# Altium PCB STM32H743I-EVAL2PCBDESIGN.PcbDoc (part 11 of 23)
Units mil, origin at the board's own origin, x right, y up, seen from the top; angles counter-clockwise.
Board outline 6558 x 5417 mil, 8 copper layers (L1_TOP, L2_GND, L3_HS1, L4_POWER, L5_SIG, L6_HS2, L7_GND, L8_BOTTOM), stack 61.368 mil thick; 620 components, 588 nets, 2945 pads, 1724 vias.
Unrouted connection lines stored in the file: 1.
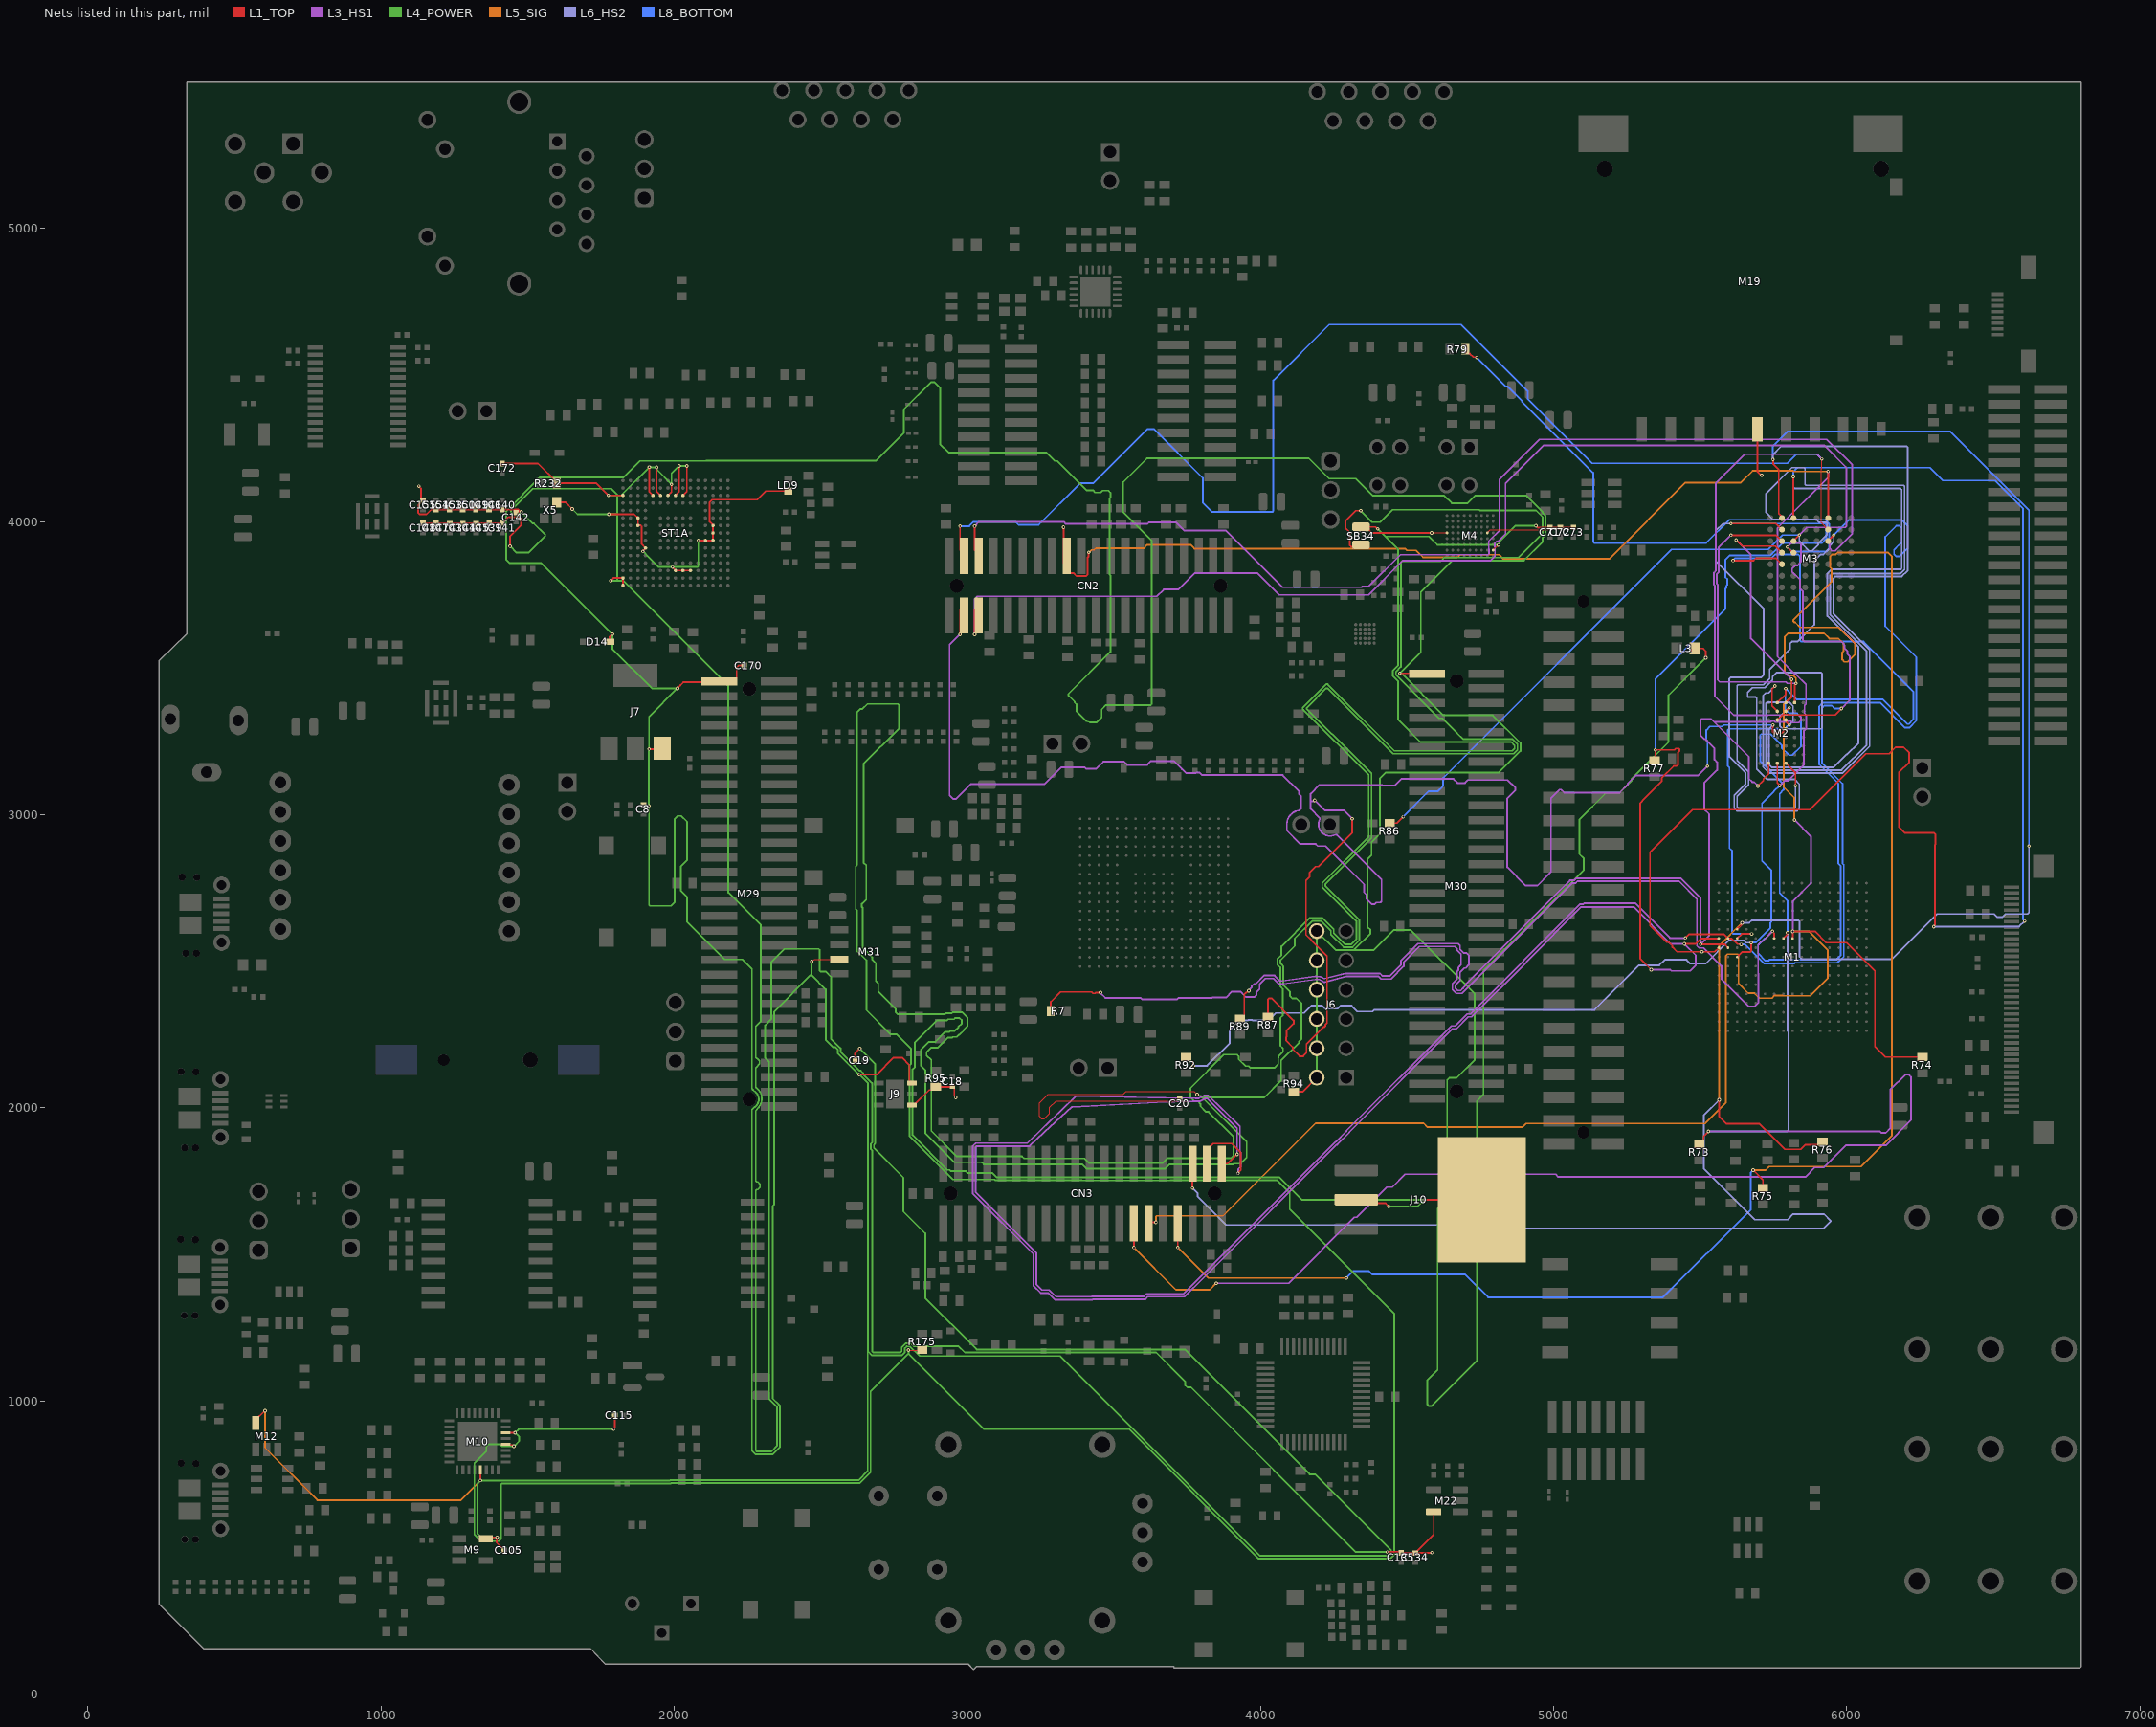
[diagram p9: the nets of this part, all layers, seen from the top]

## Part data (continued)
R208 R210 R224 R257 R267: library part RC0402FR-07100RL, "Res Thick Film 0402 100 Ohm 1% 0.063W(1/16W) ±100ppm/C Pad SMD T/R", Case Code (Imperial)=0402, Manufacturer="Yageo Group", Max Operating Temperature=155°C, Min Operating Temperature=-55°C, Power Rating=62.5mW, Supplier Part Number=311-100LRDKR-ND, Temperature Coefficient=100ppm/°C, Tolerance=1%, Voltage Rating=50V, Case/Package=0402, Category="Chip SMD Resistors", China RoHS=Non-Compliant, ComponentLink1Description=https://datasheet.octopart.com:443/RC0402FR-07100RL-Yageo-datasheet-175887523.pdf?src-supplier=Newark, ComponentLink1URL=https://datasheet.octopart.com:443/RC0402FR-07100RL-Yageo-datasheet-175887523.pdf?src-supplier=Newark, ComponentLink2Description=https://datasheet.octopart.com:443/RC0402FR-07100RL-Yageo-datasheet-8324527.pdf?src-supplier=Newark, ComponentLink2URL=https://datasheet.octopart.com:443/RC0402FR-07100RL-Yageo-datasheet-8324527.pdf?src-supplier=Newark, ComponentLink3Description=https://datasheet.octopart.com:443/RC0402FR-07100RL-Yageo-datasheet-12531192.pdf?src-supplier=Newark, ComponentLink3URL=https://datasheet.octopart.com:443/RC0402FR-07100RL-Yageo-datasheet-12531192.pdf?src-supplier=Newark, ComponentLink4Description=https://datasheet.octopart.com:443/RC0402FR-07100RL-Yageo-datasheet-103092701.pdf?src-supplier=Upverter, ComponentLink4URL=https://datasheet.octopart.com:443/RC0402FR-07100RL-Yageo-datasheet-103092701.pdf?src-supplier=Upverter, ComponentLink5Description=https://datasheet.octopart.com:443/RC0402FR-07100RL-Yageo-Group-datasheet-190305687.pdf?src-supplier=Future+Electronics, ComponentLink5URL=https://datasheet.octopart.com:443/RC0402FR-07100RL-Yageo-Group-datasheet-190305687.pdf?src-supplier=Future+Electronics, ComponentLink6Description=https://datasheet.octopart.com:443/RC0402FR-07100RL-Yageo-datasheet-164759695.pdf?src-supplier=Future+Electronics, ComponentLink6URL=https://datasheet.octopart.com:443/RC0402FR-07100RL-Yageo-datasheet-164759695.pdf?src-supplier=Future+Electronics, ComponentLink7Description=https://datasheet.octopart.com:443/RC0402FR-07100RL-Yageo-datasheet-137700087.pdf?src-supplier=Future+Electronics, ComponentLink7URL=https://datasheet.octopart.com:443/RC0402FR-07100RL-Yageo-datasheet-137700087.pdf?src-supplier=Future+Electronics, ComponentLink8Description=https://datasheet.octopart.com:443/RC0402FR-07100RL-Yageo-datasheet-8324255.pdf?src-supplier=Future+Electronics, ComponentLink8URL=https://datasheet.octopart.com:443/RC0402FR-07100RL-Yageo-datasheet-8324255.pdf?src-supplier=Future+Electronics, ComponentLink9Description=https://datasheet.octopart.com:443/RC0402FR-07100RL-Yageo-datasheet-10408619.pdf?src-supplier=element14+APAC, ComponentLink9URL=https://datasheet.octopart.com:443/RC0402FR-07100RL-Yageo-datasheet-10408619.pdf?src-supplier=element14+APAC, ComponentLink10Description=https://datasheet.octopart.com:443/RC0402FR-07100RL-Yageo-datasheet-21426659.pdf?src-supplier=element14+APAC, ComponentLink10URL=https://datasheet.octopart.com:443/RC0402FR-07100RL-Yageo-datasheet-21426659.pdf?src-supplier=element14+APAC, ComponentLink11Description=https://datasheet.octopart.com:443/RC0402FR-07100RL-Yageo-datasheet-62067350.pdf?src-supplier=Farnell, ComponentLink11URL=https://datasheet.octopart.com:443/RC0402FR-07100RL-Yageo-datasheet-62067350.pdf?src-supplier=Farnell, ComponentLink12Description=https://datasheet.octopart.com:443/RC0402FR-07100RL-Yageo-datasheet-8329306.pdf?src-supplier=element14, ComponentLink12URL=https://datasheet.octopart.com:443/RC0402FR-07100RL-Yageo-datasheet-8329306.pdf?src-supplier=element14, ComponentLink13Description=https://datasheet.octopart.com:443/RC0402FR-07100RL-Yageo-datasheet-505231.pdf?src-supplier=element14, ComponentLink13URL=https://datasheet.octopart.com:443/RC0402FR-07100RL-Yageo-datasheet-505231.pdf?src-supplier=element14, ComponentLink14Description=https://datasheet.octopart.com:443/RC0402FR-07100RL-Yageo-Group-datasheet-189192902.pdf?src-supplier=LCSC, ComponentLink14URL=https://datasheet.octopart.com:443/RC0402FR-07100RL-Yageo-Group-datasheet-189192902.pdf?src-supplier=LCSC, ComponentLink15Description=https://datasheet.octopart.com:443/RC0402FR-07100RL-Yageo-datasheet-175423674.pdf?src-supplier=SOS+electronic, ComponentLink15URL=https://datasheet.octopart.com:443/RC0402FR-07100RL-Yageo-datasheet-175423674.pdf?src-supplier=SOS+electronic, ComponentLink16Description=https://datasheet.octopart.com:443/RC0402FR-07100RL-Yageo-datasheet-79472498.pdf?src-supplier=Megastar, ComponentLink16URL=https://datasheet.octopart.com:443/RC0402FR-07100RL-Yageo-datasheet-79472498.pdf?src-supplier=Megastar, ComponentLink17Description=https://datasheet.octopart.com/RC0402FR-07100RL-Yageo-datasheet-73766026.pdf, ComponentLink17URL=https://datasheet.octopart.com/RC0402FR-07100RL-Yageo-datasheet-73766026.pdf, ComponentLink18Description=http://sigma.octopart.com:80/conflict_mineral_statement/Yageo-company-3.pdf?src-supplier=Compliance+Statements, ComponentLink18URL=http://sigma.octopart.com:80/conflict_mineral_statement/Yageo-company-3.pdf?src-supplier=Compliance+Statements, ComponentLink19Description=http://sigma.octopart.com:80/rohs_statement/Yageo-company-2.pdf?src-supplier=Compliance+Statements, ComponentLink19URL=http://sigma.octopart.com:80/rohs_statement/Yageo-company-2.pdf?src-supplier=Compliance+Statements, Composition="Thick Film", Country of Origin="Mainland China, Taiwan", Depth=500µm, Export Control Classification Number (ECCN) Code=EAR99, Harmonized Tariff Schedule (HTS) Code=8533.21.00.30, Height=350µm, Introduction Date=2004-10-04, Lead Free="Lead Free", Length=1mm, Lifecycle Status=Production, Manufacturer Part Number=RC0402FR-07100RL, Military Standard=Not, Mounting Technology="Surface Mount", Number of Terminals=2, Packaging="Tape & Reel", Pins=2, Pricing="1=0.1, 10=0.021, 25=0.0152, 50=0.012, 100=0.0097, 250=0.0074, 500=0.00612, 1000=0.00512, 5000=0.00355 (USD)", REACH SVHC=Yes, RoHS=Compliant, Schedule B="8533210045, 8533210045|8533210045|8533210045|8533210045|8533210045|8533210045|8533210045|8533210045|8533210045|8533210045|8533210045|8533210045|8533210045|8533210045|8533210045|8533210045, 8533210045|8533210045|8533210045|8533210045|8533210045|8533210045|8533210045|8533210045|8533210045|8533210045|8533210045|8533210045|8533210045|8533210045|8533210045|8533210045|8533210045, 8533210045|8533210045|8533210045|8533210045|8533210045|8533210045|8533210045|8533210045|8533210045|8533210045|8533210045|8533210045|8533210045|8533210045|8533210045|8533210045|8533210045|8533210045", Stock=2317990, Supplier=DigiKey, Termination=SMD/SMT, Voltage Rating (DC)=50V, Width=500µm, Working Voltage=50V
R223: library part CRGCQ0402F2K7, "63mW Thick Film Resistors 50V ±100ppm/℃ ±1% 2.7kΩ 0402 Chip Resistor - Surface Mount ROHS", Ambient Temperature Range High=70°C, Case/Package=0402, Manufacturer="TE Connectivity", Manufacturer Lifecycle Status=ACTIVE, Max Operating Temperature=155°C, Min Operating Temperature=-55°C, Operating Supply Voltage=50V, Power Rating=62.5mW, Ratings=AEC-Q200, Supplier Part Number=A129632DKR-ND, Temperature Coefficient=100ppm/°C, Tolerance=1%, Category="Chip SMD Resistors", China RoHS=Non-Compliant, ComponentLink1Description=https://datasheet.octopart.com:443/CRGCQ0402F2K7-TE-Connectivity-datasheet-114679081.pdf?src-supplier=Master+Electronics, ComponentLink1URL=https://datasheet.octopart.com:443/CRGCQ0402F2K7-TE-Connectivity-datasheet-114679081.pdf?src-supplier=Master+Electronics, ComponentLink2Description=https://datasheet.octopart.com:443/3-2176337-0-TE-Connectivity---AMP-datasheet-189108688.pdf?src-supplier=Master+Electronics, ComponentLink2URL=https://datasheet.octopart.com:443/3-2176337-0-TE-Connectivity---AMP-datasheet-189108688.pdf?src-supplier=Master+Electronics, ComponentLink3Description=https://datasheet.octopart.com:443/CRGCQ0402F2K7-TE-Connectivity-datasheet-179161773.pdf?src-supplier=IHS, ComponentLink3URL=https://datasheet.octopart.com:443/CRGCQ0402F2K7-TE-Connectivity-datasheet-179161773.pdf?src-supplier=IHS, ComponentLink4Description=https://sigma.octopart.com:443/114679084/technical_drawing/TE-Connectivity-CRGCQ0402F2K7.pdf?src-supplier=Sager+Electronics, ComponentLink4URL=https://sigma.octopart.com:443/114679084/technical_drawing/TE-Connectivity-CRGCQ0402F2K7.pdf?src-supplier=Sager+Electronics, Composition="Thick Film", Export Control Classification Number (ECCN) Code=EAR99, Harmonized Tariff Schedule (HTS) Code=8533.21.00.30, Height=350µm, Introduction Date=2018-03-13, Length=1mm, Lifecycle Status=Production, Manufacturer Part Number=CRGCQ0402F2K7, Mounting Technology="Surface Mount", Number of Terminals=2, Packaging="Cut Tape", Pricing="1=0.1, 10=0.03, 25=0.0224, 50=0.0182, 100=0.0149, 250=0.01164, 500=0.00978, 1000=0.00832, 5000=0.00603 (USD)", REACH SVHC=Yes, RoHS=Compliant, Schedule B="8533210025, 8533210025|8533210025|8533210025|8533210025|8533210025, 8533210045", Stock=561623, Supplier=DigiKey, Voltage Rating=50V, Voltage Rating (DC)=50V, Width=500µm, Working Voltage=50V
R231: library part AC0402FR-073KL, "Res Thick Film 0402 3K Ohm 1% 0.063W(1/16W) ±100ppm/C Pad SMD Automotive T/R", Case Code (Imperial)=0402, Case Code (Metric)=1005, Manufacturer="Yageo Group", Max Operating Temperature=155°C, Max Power Dissipation=63mW, Min Operating Temperature=-55°C, Power Rating=62.5mW, Ratings=AEC-Q200, Supplier Part Number=YAG3485TR-ND, Temperature Coefficient=100ppm/°C, Tolerance=1%, Voltage Rating=50V, Case/Package=0402, Category="Chip SMD Resistors", China RoHS=Non-Compliant, ComponentLink1Description=https://datasheet.octopart.com:443/AC0402FR-073KL-Yageo-datasheet-182189377.pdf?src-supplier=IHS, ComponentLink1URL=https://datasheet.octopart.com:443/AC0402FR-073KL-Yageo-datasheet-182189377.pdf?src-supplier=IHS, ComponentLink2Description=https://datasheet.octopart.com:443/AC0402FR-073KL-Yageo-datasheet-83209224.pdf?src-supplier=Upverter, ComponentLink2URL=https://datasheet.octopart.com:443/AC0402FR-073KL-Yageo-datasheet-83209224.pdf?src-supplier=Upverter, ComponentLink3Description=https://datasheet.octopart.com:443/AC0402FR-073KL-Yageo-datasheet-178509465.pdf?src-supplier=Newark, ComponentLink3URL=https://datasheet.octopart.com:443/AC0402FR-073KL-Yageo-datasheet-178509465.pdf?src-supplier=Newark, ComponentLink4Description=https://datasheet.octopart.com/AC0402FR-073KL-Yageo-datasheet-12512238.pdf, ComponentLink4URL=https://datasheet.octopart.com/AC0402FR-073KL-Yageo-datasheet-12512238.pdf, ComponentLink5Description=https://datasheet.octopart.com:443/AC0402FR-073KL-Yageo-Group-datasheet-189830439.pdf?src-supplier=Future+Electronics, ComponentLink5URL=https://datasheet.octopart.com:443/AC0402FR-073KL-Yageo-Group-datasheet-189830439.pdf?src-supplier=Future+Electronics, ComponentLink6Description=https://datasheet.octopart.com:443/AC0402FR-073KL-Yageo-datasheet-166720450.pdf?src-supplier=Future+Electronics, ComponentLink6URL=https://datasheet.octopart.com:443/AC0402FR-073KL-Yageo-datasheet-166720450.pdf?src-supplier=Future+Electronics, ComponentLink7Description=https://datasheet.octopart.com:443/AC0402FR-073KL-Yageo-datasheet-151884373.pdf?src-supplier=Future+Electronics, ComponentLink7URL=https://datasheet.octopart.com:443/AC0402FR-073KL-Yageo-datasheet-151884373.pdf?src-supplier=Future+Electronics, ComponentLink8Description=https://datasheet.octopart.com:443/AC0402FR-073KL-Yageo-datasheet-137699919.pdf?src-supplier=Future+Electronics, ComponentLink8URL=https://datasheet.octopart.com:443/AC0402FR-073KL-Yageo-datasheet-137699919.pdf?src-supplier=Future+Electronics, ComponentLink9Description=https://datasheet.octopart.com:443/AC0402FR-073KL-Yageo-datasheet-24580492.pdf?src-supplier=Future+Electronics, ComponentLink9URL=https://datasheet.octopart.com:443/AC0402FR-073KL-Yageo-datasheet-24580492.pdf?src-supplier=Future+Electronics, ComponentLink10Description=https://datasheet.octopart.com:443/AC0402FR-073KL-Yageo-datasheet-13029202.pdf?src-supplier=Future+Electronics, ComponentLink10URL=https://datasheet.octopart.com:443/AC0402FR-073KL-Yageo-datasheet-13029202.pdf?src-supplier=Future+Electronics, ComponentLink11Description=https://datasheet.octopart.com:443/AC0402FR-073KL-Yageo-Group-datasheet-188689268.pdf?src-supplier=TME, ComponentLink11URL=https://datasheet.octopart.com:443/AC0402FR-073KL-Yageo-Group-datasheet-188689268.pdf?src-supplier=TME, ComponentLink12Description=https://datasheet.octopart.com:443/AC0402FR-073KL-Yageo-Group-datasheet-164768995.pdf?src-supplier=ODG+(Origin+Data+Global), ComponentLink12URL=https://datasheet.octopart.com:443/AC0402FR-073KL-Yageo-Group-datasheet-164768995.pdf?src-supplier=ODG+(Origin+Data+Global), ComponentLink13Description=https://datasheet.octopart.com:443/AC0402FR-073KL-Yageo-datasheet-128678012.pdf?src-supplier=X-ON, ComponentLink13URL=https://datasheet.octopart.com:443/AC0402FR-073KL-Yageo-datasheet-128678012.pdf?src-supplier=X-ON, ComponentLink14Description=http://sigma.octopart.com:80/conflict_mineral_statement/Yageo-company-3.pdf?src-supplier=Compliance+Statements, ComponentLink14URL=http://sigma.octopart.com:80/conflict_mineral_statement/Yageo-company-3.pdf?src-supplier=Compliance+Statements, ComponentLink15Description=http://sigma.octopart.com:80/rohs_statement/Yageo-company-2.pdf?src-supplier=Compliance+Statements, ComponentLink15URL=http://sigma.octopart.com:80/rohs_statement/Yageo-company-2.pdf?src-supplier=Compliance+Statements, Composition="Thick Film", Features="Automotive AEC-Q200, Moisture Resistant", Height=320µm, Lead Free="Lead Free", Length=1mm, Lifecycle Status=Production, Manufacturer Part Number=AC0402FR-073KL, Mounting Technology="Surface Mount", Number of Terminals=2, Number of Terminations=2, Packaging="Tape & Reel", Pricing="10000=0.00402, 20000=0.00359, 30000=0.00337, 50000=0.00314, 70000=0.00301, 100000=0.00289 (USD)", REACH SVHC=Yes, RoHS=Compliant, Schedule B=8533210045, Stock=181824, Supplier=DigiKey, Termination=SMD/SMT, Width=500µm, Working Voltage=50V
R249 R250 R251 R252 R253 R254: library part CRCW040222R0FKED, "62.5mW Thick Film Resistors 50V ±1% ±100ppm/℃ 22Ω 0402 Chip Resistor - Surface Mount ROHS", Case Code (Imperial)=0402, Manufacturer=Vishay, Max Operating Temperature=155°C, Max Power Dissipation=63mW, Min Operating Temperature=-55°C, Ratings=AEC-Q200, Supplier Part Number=541-22.0LCT-ND, Temperature Coefficient=100ppm/°C, Tolerance=1%, Voltage Rating=50V, Case/Package=0402, Category="Chip SMD Resistors", China RoHS=Non-Compliant, ComponentLink1Description=https://datasheet.octopart.com:443/CRCW040222R0FKED-Vishay-datasheet-175423584.pdf?src-supplier=IHS, ComponentLink1URL=https://datasheet.octopart.com:443/CRCW040222R0FKED-Vishay-datasheet-175423584.pdf?src-supplier=IHS, ComponentLink2Description=https://datasheet.octopart.com:443/CRCW040222R0FKED-Vishay-datasheet-5306405.pdf?src-supplier=RS+(Formerly+Allied+Electronics), ComponentLink2URL=https://datasheet.octopart.com:443/CRCW040222R0FKED-Vishay-datasheet-5306405.pdf?src-supplier=RS+(Formerly+Allied+Electronics), ComponentLink3Description=https://datasheet.octopart.com:443/CRCW040222R0FKED-Vishay-Dale-datasheet-47688880.pdf?src-supplier=RS+(Formerly+Allied+Electronics), ComponentLink3URL=https://datasheet.octopart.com:443/CRCW040222R0FKED-Vishay-Dale-datasheet-47688880.pdf?src-supplier=RS+(Formerly+Allied+Electronics), ComponentLink4Description=https://datasheet.octopart.com:443/CRCW040222R0FKED-Vishay-datasheet-12001583.pdf?src-supplier=RS+(Formerly+Allied+Electronics), ComponentLink4URL=https://datasheet.octopart.com:443/CRCW040222R0FKED-Vishay-datasheet-12001583.pdf?src-supplier=RS+(Formerly+Allied+Electronics), ComponentLink5Description=https://datasheet.octopart.com:443/CRCW040222R0FKED-Vishay-datasheet-83961561.pdf?src-supplier=element14+APAC, ComponentLink5URL=https://datasheet.octopart.com:443/CRCW040222R0FKED-Vishay-datasheet-83961561.pdf?src-supplier=element14+APAC, ComponentLink6Description=https://datasheet.octopart.com:443/CRCW040222R0FKED-Vishay-datasheet-62317933.pdf?src-supplier=element14+APAC, ComponentLink6URL=https://datasheet.octopart.com:443/CRCW040222R0FKED-Vishay-datasheet-62317933.pdf?src-supplier=element14+APAC, ComponentLink7Description=https://datasheet.octopart.com:443/CRCW040222R0FKED-Vishay-datasheet-14722531.pdf?src-supplier=element14+APAC, ComponentLink7URL=https://datasheet.octopart.com:443/CRCW040222R0FKED-Vishay-datasheet-14722531.pdf?src-supplier=element14+APAC, ComponentLink8Description=https://datasheet.octopart.com:443/CRCW040222R0FKED-Vishay-datasheet-66077789.pdf?src-supplier=element14+APAC, ComponentLink8URL=https://datasheet.octopart.com:443/CRCW040222R0FKED-Vishay-datasheet-66077789.pdf?src-supplier=element14+APAC, ComponentLink9Description=https://datasheet.octopart.com:443/CRCW040222R0FKED.-Vishay-datasheet-78776209.pdf?src-supplier=Newark, ComponentLink9URL=https://datasheet.octopart.com:443/CRCW040222R0FKED.-Vishay-datasheet-78776209.pdf?src-supplier=Newark, ComponentLink10Description=https://datasheet.octopart.com:443/CRCW040222R0FKED-Vishay-datasheet-11516975.pdf?src-supplier=Newark, ComponentLink10URL=https://datasheet.octopart.com:443/CRCW040222R0FKED-Vishay-datasheet-11516975.pdf?src-supplier=Newark, ComponentLink11Description=https://datasheet.octopart.com:443/CRCW040222R0FKED-Vishay-datasheet-41302739.pdf?src-supplier=Newark, ComponentLink11URL=https://datasheet.octopart.com:443/CRCW040222R0FKED-Vishay-datasheet-41302739.pdf?src-supplier=Newark, ComponentLink12Description=https://datasheet.octopart.com:443/CRCW040222R0FKED-Vishay-datasheet-33013972.pdf?src-supplier=Newark, ComponentLink12URL=https://datasheet.octopart.com:443/CRCW040222R0FKED-Vishay-datasheet-33013972.pdf?src-supplier=Newark, ComponentLink13Description=https://datasheet.octopart.com:443/CRCW040222R0FKED-Vishay-datasheet-21226360.pdf?src-supplier=Newark, ComponentLink13URL=https://datasheet.octopart.com:443/CRCW040222R0FKED-Vishay-datasheet-21226360.pdf?src-supplier=Newark, ComponentLink14Description=https://datasheet.octopart.com:443/CRCW040222R0FKED-Vishay-datasheet-62316122.pdf?src-supplier=Future+Electronics, ComponentLink14URL=https://datasheet.octopart.com:443/CRCW040222R0FKED-Vishay-datasheet-62316122.pdf?src-supplier=Future+Electronics, ComponentLink15Description=https://datasheet.octopart.com:443/CRCW040222R0FKED-Vishay-datasheet-12519820.pdf?src-supplier=Future+Electronics, ComponentLink15URL=https://datasheet.octopart.com:443/CRCW040222R0FKED-Vishay-datasheet-12519820.pdf?src-supplier=Future+Electronics, ComponentLink16Description=https://datasheet.octopart.com:443/CRCW040222R0FKED-Vishay-datasheet-62332075.pdf?src-supplier=TME, ComponentLink16URL=https://datasheet.octopart.com:443/CRCW040222R0FKED-Vishay-datasheet-62332075.pdf?src-supplier=TME, ComponentLink17Description=https://datasheet.octopart.com/D-CRCW-e3-Standard-Thick-Film-Chip-Resistors-Vishay-datasheet-family-64.pdf, ComponentLink17URL=https://datasheet.octopart.com/D-CRCW-e3-Standard-Thick-Film-Chip-Resistors-Vishay-datasheet-family-64.pdf, ComponentLink18Description=https://datasheet.octopart.com:443/CRCW040222R0FKED-Vishay-datasheet-13242068.pdf?src-supplier=Farnell, ComponentLink18URL=https://datasheet.octopart.com:443/CRCW040222R0FKED-Vishay-datasheet-13242068.pdf?src-supplier=Farnell, ComponentLink19Description=https://datasheet.octopart.com:443/CRCW040222R0FKED-Vishay-datasheet-13195083.pdf?src-supplier=Farnell, ComponentLink19URL=https://datasheet.octopart.com:443/CRCW040222R0FKED-Vishay-datasheet-13195083.pdf?src-supplier=Farnell, ComponentLink20Description=https://datasheet.octopart.com:443/CRCW040222R0FKED-Vishay-datasheet-13034211.pdf?src-supplier=Farnell, ComponentLink20URL=https://datasheet.octopart.com:443/CRCW040222R0FKED-Vishay-datasheet-13034211.pdf?src-supplier=Farnell, ComponentLink21Description=https://datasheet.octopart.com:443/CRCW040222R0FKED-Vishay-datasheet-12600034.pdf?src-supplier=Farnell, ComponentLink21URL=https://datasheet.octopart.com:443/CRCW040222R0FKED-Vishay-datasheet-12600034.pdf?src-supplier=Farnell, ComponentLink22Description=https://datasheet.octopart.com:443/CRCW040222R0FKED-Vishay-datasheet-12532161.pdf?src-supplier=Farnell, ComponentLink22URL=https://datasheet.octopart.com:443/CRCW040222R0FKED-Vishay-datasheet-12532161.pdf?src-supplier=Farnell, ComponentLink23Description=https://datasheet.octopart.com:443/CRCW040222R0FKED-Vishay-datasheet-12517896.pdf?src-supplier=Farnell, ComponentLink23URL=https://datasheet.octopart.com:443/CRCW040222R0FKED-Vishay-datasheet-12517896.pdf?src-supplier=Farnell, ComponentLink24Description=https://datasheet.octopart.com:443/CRCW040222R0FKED-Vishay-datasheet-12509762.pdf?src-supplier=Farnell, ComponentLink24URL=https://datasheet.octopart.com:443/CRCW040222R0FKED-Vishay-datasheet-12509762.pdf?src-supplier=Farnell, ComponentLink25Description=https://datasheet.octopart.com:443/CRCW040222R0FKED-Vishay-datasheet-10322335.pdf?src-supplier=Farnell, ComponentLink25URL=https://datasheet.octopart.com:443/CRCW040222R0FKED-Vishay-datasheet-10322335.pdf?src-supplier=Farnell, ComponentLink26Description=https://datasheet.octopart.com:443/CRCW040222R0FKED-Vishay-datasheet-8788789.pdf?src-supplier=Farnell, ComponentLink26URL=https://datasheet.octopart.com:443/CRCW040222R0FKED-Vishay-datasheet-8788789.pdf?src-supplier=Farnell, ComponentLink27Description=https://datasheet.octopart.com:443/CRCW040222R0FKED-Vishay-datasheet-8361388.pdf?src-supplier=Farnell, ComponentLink27URL=https://datasheet.octopart.com:443/CRCW040222R0FKED-Vishay-datasheet-8361388.pdf?src-supplier=Farnell, ComponentLink28Description=https://datasheet.octopart.com:443/CRCW040222R0FKED-Vishay-datasheet-5300368.pdf?src-supplier=Farnell, ComponentLink28URL=https://datasheet.octopart.com:443/CRCW040222R0FKED-Vishay-datasheet-5300368.pdf?src-supplier=Farnell, ComponentLink29Description=https://datasheet.octopart.com:443/CRCW040222R0FKED-Vishay-datasheet-546287.pdf?src-supplier=Farnell, ComponentLink29URL=https://datasheet.octopart.com:443/CRCW040222R0FKED-Vishay-datasheet-546287.pdf?src-supplier=Farnell, ComponentLink30Description=https://datasheet.octopart.com:443/CRCW040222R0FKED-Vishay-datasheet-11547618.pdf?src-supplier=Arrow+Electronics, ComponentLink30URL=https://datasheet.octopart.com:443/CRCW040222R0FKED-Vishay-datasheet-11547618.pdf?src-supplier=Arrow+Electronics, ComponentLink31Description=https://datasheet.octopart.com:443/CRCW040222R0FKED-Vishay-datasheet-8619608.pdf?src-supplier=element14, ComponentLink31URL=https://datasheet.octopart.com:443/CRCW040222R0FKED-Vishay-datasheet-8619608.pdf?src-supplier=element14, ComponentLink32Description=http://sigma.octopart.com:80/rohs_certificate/D-CRCW-e3-Standard-Thick-Film-Chip-Resistors-Vishay-family-102.pdf?src-supplier=Compliance+Statements, ComponentLink32URL=http://sigma.octopart.com:80/rohs_certificate/D-CRCW-e3-Standard-Thick-Film-Chip-Resistors-Vishay-family-102.pdf?src-supplier=Compliance+Statements, Composition="Thick Film", Contact Plating=Tin, Country of Origin="Israel, Taiwan", Depth=500µm, Export Control Classification Number (ECCN) Code=EAR99, Features="Automotive AEC-Q200", Harmonized Tariff Schedule (HTS) Code=8533.21.00.30, Height=350µm, Introduction Date=2005-03-24, Lead Free="Lead Free", Length=1mm, Lifecycle Status=Production, Manufacturer Part Number=CRCW040222R0FKED, Military Standard=Not, Mounting Technology="Surface Mount", Number of Terminals=2, Number of Terminations=2, Packaging="Cut Tape", Pins=2, Power Rating=63mW, Pricing="1=0.1, 10=0.032, 25=0.0236, 50=0.0192, 100=0.0157, 250=0.01228, 500=0.01034, 1000=0.00882, 5000=0.00642 (USD)", Radiation Hardening=No, REACH SVHC=Yes, RoHS=Compliant, Schedule B="8533210045, 8533210045|8533210045|8533210045|8533210045|8533210045|8533210045|8533210045|8533210045|8533210045|8533210045|8533210045|8533210045|8533210045|8533210045|8533210045|8533210045|8533210045|8533210045|8533210045|8533210045|8533210045|8533210045|8533210045|85", Stock=674326, Supplier=DigiKey, Termination=SMD/SMT, Voltage Rating (DC)=50V, Weight=652.039032µg, Width=500µm, Working Voltage=50V
RV1: "Trimmer, Cermet, 0.5W, 10000ohm, 10% +/-Tol, 100ppm/Cel, 1 Turn(s)", Manufacturer=Bourns, Max Operating Temperature=125°C, Max Power Dissipation=500mW, Min Operating Temperature=-55°C, Supplier Part Number=3386P-103TLF-ND, Temperature Coefficient=100ppm/°C, Tolerance=10%, Voltage Rating=300V, Category="Variable Resistors and Potentiometers", ComponentLink1Description=https://datasheet.octopart.com:443/3386P-1-103TLF-Bourns-datasheet-175646159.pdf?src-supplier=IHS, ComponentLink1URL=https://datasheet.octopart.com:443/3386P-1-103TLF-Bourns-datasheet-175646159.pdf?src-supplier=IHS, ComponentLink2Description=https://datasheet.octopart.com:443/3386P-1-103TLF-Bourns-datasheet-375.pdf?src-supplier=Master+Electronics, ComponentLink2URL=https://datasheet.octopart.com:443/3386P-1-103TLF-Bourns-datasheet-375.pdf?src-supplier=Master+Electronics, ComponentLink3Description=https://datasheet.octopart.com:443/3386P-1-103TLF-Bourns-datasheet-62341472.pdf?src-supplier=Farnell, ComponentLink3URL=https://datasheet.octopart.com:443/3386P-1-103TLF-Bourns-datasheet-62341472.pdf?src-supplier=Farnell, ComponentLink4Description=https://datasheet.octopart.com:443/3386P-1-103TLF-Bourns-datasheet-25360175.pdf?src-supplier=RS+(Formerly+Allied+Electronics), ComponentLink4URL=https://datasheet.octopart.com:443/3386P-1-103TLF-Bourns-datasheet-25360175.pdf?src-supplier=RS+(Formerly+Allied+Electronics), ComponentLink5Description=https://datasheet.octopart.com:443/3386P-1-103TLF-Bourns-datasheet-10840548.pdf?src-supplier=Electro+Sonic, ComponentLink5URL=https://datasheet.octopart.com:443/3386P-1-103TLF-Bourns-datasheet-10840548.pdf?src-supplier=Electro+Sonic, ComponentLink6Description=https://datasheet.octopart.com:443/3386P-1-103TLF-Bourns-datasheet-147334286.pdf?src-supplier=Electro+Sonic, ComponentLink6URL=https://datasheet.octopart.com:443/3386P-1-103TLF-Bourns-datasheet-147334286.pdf?src-supplier=Electro+Sonic, ComponentLink7Description=https://datasheet.octopart.com:443/3386P-1-103TLF-Bourns-datasheet-17172198.pdf?src-supplier=element14+APAC, ComponentLink7URL=https://datasheet.octopart.com:443/3386P-1-103TLF-Bourns-datasheet-17172198.pdf?src-supplier=element14+APAC, ComponentLink8Description=https://datasheet.octopart.com:443/3386P-1-103TLF-Bourns-datasheet-8714847.pdf?src-supplier=Factory+Futures, ComponentLink8URL=https://datasheet.octopart.com:443/3386P-1-103TLF-Bourns-datasheet-8714847.pdf?src-supplier=Factory+Futures, ComponentLink9Description=https://datasheet.octopart.com:443/3386P-1-103TLF-Bourns-datasheet-20860029.pdf?src-supplier=Newark, ComponentLink9URL=https://datasheet.octopart.com:443/3386P-1-103TLF-Bourns-datasheet-20860029.pdf?src-supplier=Newark, ComponentLink10Description=https://datasheet.octopart.com/3386P-1-103TLF-Bourns-datasheet-8361462.pdf, ComponentLink10URL=https://datasheet.octopart.com/3386P-1-103TLF-Bourns-datasheet-8361462.pdf, ComponentLink11Description=http://sigma.octopart.com:80/conflict_mineral_statement/Bourns-company-36.pdf?src-supplier=Compliance+Statements, ComponentLink11URL=http://sigma.octopart.com:80/conflict_mineral_statement/Bourns-company-36.pdf?src-supplier=Compliance+Statements, Composition=Cermet, Contact Plating=Tin, Country of Origin="Costa Rica", Depth=9.53mm, Export Control Classification Number (ECCN) Code=EAR99, Harmonized Tariff Schedule (HTS) Code=8533.40.80.50, Height=4.83mm, Introduction Date=2007-02-08, Lead Diameter=510µm, Lead Free="Lead Free", Lead Length=5.97mm, Length=9.53mm, Lifecycle Status=Production, Manufacturer Part Number=3386P-1-103TLF, Military Standard=Not, Mounting Technology="PCB, Through Hole", Number of Terminals=3, Number of Turns=1, Power Rating=500mW, Pricing="1=2.82, 10=2.352, 25=2.1848, 50=2.0658, 100=1.9529, 250=1.81228, 500=1.71228, 1000=1.61756, 5000=1.4167 (USD)", Radiation Hardening=No, REACH SVHC=No, RoHS=Compliant, Schedule B="8533400080, 8533400080|8533400080|8533400080|8533400080|8533400080", Stock=15820, Supplier=DigiKey, Taper=Linear, Termination=Pin, Weight=850.485694mg, Width=9.53mm
ST1A: "MCU 32-Bit STM32 ARM Cortex M7 RISC 512KB Flash 1.8V/2.5V/3.3V 176-Pin UFBGA Tray", Clock Frequency=216MHz, Manufacturer=STMicroelectronics, Max Operating Temperature=85°C, Max Supply Current=180mA, Max Supply Voltage=3.6V, Min Operating Temperature=-40°C, Min Supply Voltage=1.7V, Nominal Supply Voltage (DC)=3.3V, Supplier Part Number=497-17186-ND, ADC Channels (Resolution)="24-Ch 12-Bit", Category=Microcontrollers, China RoHS=Compliant, ComponentLink1Description=https://datasheet.octopart.com:443/STM32F723IEK6-STMicroelectronics-datasheet-181247470.pdf?src-supplier=IHS, ComponentLink1URL=https://datasheet.octopart.com:443/STM32F723IEK6-STMicroelectronics-datasheet-181247470.pdf?src-supplier=IHS, ComponentLink2Description=https://datasheet.octopart.com:443/STM32F723IEK6-STMicroelectronics-datasheet-66832945.pdf?src-supplier=Future+Electronics, ComponentLink2URL=https://datasheet.octopart.com:443/STM32F723IEK6-STMicroelectronics-datasheet-66832945.pdf?src-supplier=Future+Electronics, ComponentLink3Description=https://datasheet.octopart.com:443/STM32F723IEK6-STMicroelectronics-datasheet-77992479.pdf?src-supplier=Future+Electronics, ComponentLink3URL=https://datasheet.octopart.com:443/STM32F723IEK6-STMicroelectronics-datasheet-77992479.pdf?src-supplier=Future+Electronics, ComponentLink4Description=https://datasheet.octopart.com:443/STM32F723IEK6-STMicroelectronics-datasheet-163660272.pdf?src-supplier=SHENGYU+ELECTRONICS, ComponentLink4URL=https://datasheet.octopart.com:443/STM32F723IEK6-STMicroelectronics-datasheet-163660272.pdf?src-supplier=SHENGYU+ELECTRONICS, DAC Channels (Resolution)="2-Ch 12-Bit", EEPROM Memory Size=0B, Flash Memory Size=512kB, Frequency=216MHz, Height - Seated (Max)=600µm, Interface=CAN, Length=10mm, Lifecycle Status=Production, Manufacturer Part Number=STM32F723IEK6, Memory Format=FLASH, Number of A/D Converters=3, Number of Channels=24, Number of D/A Converters=2, Number of I2C Channels=4, Number of I/Os=9, Number of Interrupts=16, Number of SPI Channels=5, Number of Terminals=176, Number of Timers/Counters=16, Number of UART Channels=4, Number of USART Channels=4, Peripherals="POR, RTC", Pricing="1=19.62, 10=15.579, 50=13.9606, 100=13.4595, 500=12.61156 (USD)", RAM Size=256kB, REACH SVHC=Yes, RoHS=Compliant, Schedule B="8542310000, 8542310000|8542310000|8542310000|8542310000|8542310000", Stock=4234, Supplier=DigiKey, Terminal Pitch=650µm, Width=10mm
SW1: "Slide Switch, 1 Positions, Dp3T, Latched, 0.3A, 6Vdc, 8 Pcb Hole Cnt, Solder Terminal, Through", Color=Black, Contact Current Rating=300mA, Contact Resistance=70mΩ, Insulation Resistance=100MΩ, Manufacturer="C&K Components", Max Operating Temperature=85°C, Max Voltage Rating (DC)=6V, Min Operating Temperature=-40°C, Supplier Part Number=401-2004-ND, Actuator Length=2.0066mm, Actuator Material=Nylon, Category="Slide Switches", ComponentLink1Description=https://datasheet.octopart.com:443/JS203011CQN-C%26K-Components-datasheet-67873653.pdf?src-supplier=IHS, ComponentLink1URL=https://datasheet.octopart.com:443/JS203011CQN-C%26K-Components-datasheet-67873653.pdf?src-supplier=IHS, ComponentLink2Description=https://datasheet.octopart.com:443/JS203011CQN-C%26K-Components-datasheet-62289006.pdf?src-supplier=Electro+Sonic, ComponentLink2URL=https://datasheet.octopart.com:443/JS203011CQN-C%26K-Components-datasheet-62289006.pdf?src-supplier=Electro+Sonic, ComponentLink3Description=https://datasheet.octopart.com:443/JS203011CQN-C%26K-Components-datasheet-23707816.pdf?src-supplier=Electro+Sonic, ComponentLink3URL=https://datasheet.octopart.com:443/JS203011CQN-C%26K-Components-datasheet-23707816.pdf?src-supplier=Electro+Sonic, ComponentLink4Description=https://datasheet.octopart.com:443/JS203011CQN-C%26K-Components-datasheet-62100994.pdf?src-supplier=Electro+Sonic, ComponentLink4URL=https://datasheet.octopart.com:443/JS203011CQN-C%26K-Components-datasheet-62100994.pdf?src-supplier=Electro+Sonic, ComponentLink5Description=https://datasheet.octopart.com:443/JS203011CQN-C%26K-Components-datasheet-27907544.pdf?src-supplier=Newark, ComponentLink5URL=https://datasheet.octopart.com:443/JS203011CQN-C%26K-Components-datasheet-27907544.pdf?src-supplier=Newark, ComponentLink6Description=https://datasheet.octopart.com:443/JS203011CQN-C%26K-Components-datasheet-138126065.pdf?src-supplier=TME, ComponentLink6URL=https://datasheet.octopart.com:443/JS203011CQN-C%26K-Components-datasheet-138126065.pdf?src-supplier=TME, ComponentLink7Description=https://datasheet.octopart.com:443/JS203011CQN-C%26K-Components-datasheet-13385845.pdf?src-supplier=Factory+Futures, ComponentLink7URL=https://datasheet.octopart.com:443/JS203011CQN-C%26K-Components-datasheet-13385845.pdf?src-supplier=Factory+Futures, ComponentLink8Description=https://datasheet.octopart.com:443/JS203011CQN-C%26K-datasheet-8475549.pdf?src-supplier=element14, ComponentLink8URL=https://datasheet.octopart.com:443/JS203011CQN-C%26K-datasheet-8475549.pdf?src-supplier=element14, ComponentLink9Description=http://sigma.octopart.com:80/reach_statement/ITT-company-18.pdf?src-supplier=Compliance+Statements, ComponentLink9URL=http://sigma.octopart.com:80/reach_statement/ITT-company-18.pdf?src-supplier=Compliance+Statements, Contact Plating=Silver, Current Rating=300mA, Depth=3.6mm, Electrical Life=5kcycles, Height=3.5mm, Housing Material=Nylon, Lead Free="Lead Free", Length=13mm, Life (Cycles)=5kcycles, Lifecycle Status=Production, Manufacturer Part Number=JS203011CQN, Max Current Rating=300mA, Mounting Technology="Through Hole", Number of Positions=1, Packaging=Bulk, Pins=2, Pricing="1=0.93, 10=0.794, 25=0.7384, 100=0.6584, 250=0.60996, 500=0.57622, 1000=0.54528, 2500=0.50883, 5000=0.48459 (USD)", Radiation Hardening=No, REACH SVHC=Yes, RoHS=Compliant, Stock=7908, Supplier=DigiKey, Switch Function=On-On-On, Switch Travel=2mm, Terminal Material=Brass, Termination=Solder, Throw Configuration=DP3T, Voltage Rating (DC)=6V
T1 T2 T4 T5: "Bipolar (BJT) Single Transistor, NPN, 40 V, 600 mA, 300 mW, SOT-23, Surface Mount", Case/Package=SOT-23, Clock Frequency=300MHz, Collector Base Voltage (VCBO)=75V, Collector Emitter Breakdown Voltage=40V, Collector Emitter Saturation Voltage=1V, Continuous Collector Current=600mA, Current=1A, Emitter Base Voltage (VEBO)=6V, Manufacturer="Diodes Inc.", Max Junction Temperature (Tj)=150°C, Max Power Dissipation=300mW, Min Operating Temperature=-55°C, Power Dissipation=310mW, Supplier Part Number=MMBT2222A-FDITR-ND, Category=BJTs, China RoHS=Compliant, Collector Emitter Voltage (VCEO)=40V, ComponentLink1Description=https://datasheet.octopart.com:443/MMBT2222A-7-F-Diodes-Inc.-datasheet-179056681.pdf?src-supplier=Newark, ComponentLink1URL=https://datasheet.octopart.com:443/MMBT2222A-7-F-Diodes-Inc.-datasheet-179056681.pdf?src-supplier=Newark, ComponentLink2Description=https://datasheet.octopart.com:443/MMBT2222A-7-F-Diodes-Inc.-datasheet-62305184.pdf?src-supplier=Newark, ComponentLink2URL=https://datasheet.octopart.com:443/MMBT2222A-7-F-Diodes-Inc.-datasheet-62305184.pdf?src-supplier=Newark, ComponentLink3Description=https://datasheet.octopart.com:443/MMBT2222A-7-F-Diodes-Inc.-datasheet-8332362.pdf?src-supplier=Newark, ComponentLink3URL=https://datasheet.octopart.com:443/MMBT2222A-7-F-Diodes-Inc.-datasheet-8332362.pdf?src-supplier=Newark, ComponentLink4Description=https://datasheet.octopart.com:443/MMBT2222A-7-F-Diodes-Inc.-datasheet-41567372.pdf?src-supplier=Upverter, ComponentLink4URL=https://datasheet.octopart.com:443/MMBT2222A-7-F-Diodes-Inc.-datasheet-41567372.pdf?src-supplier=Upverter, ComponentLink5Description=https://sigma.octopart.com:443/138706058/technical_drawing/Diodes-Inc.-MMBT2222A-7-F.pdf?src-supplier=Upverter, ComponentLink5URL=https://sigma.octopart.com:443/138706058/technical_drawing/Diodes-Inc.-MMBT2222A-7-F.pdf?src-supplier=Upverter, ComponentLink6Description=https://sigma.octopart.com:443/138895845/technical_drawing/Diodes-Inc.-MMBT2222A-7-F.pdf?src-supplier=Diodes+Inc+SCT, ComponentLink6URL=https://sigma.octopart.com:443/138895845/technical_drawing/Diodes-Inc.-MMBT2222A-7-F.pdf?src-supplier=Diodes+Inc+SCT, ComponentLink7Description=https://datasheet.octopart.com:443/MMBT2222A-7-F-Diodes-Inc.-datasheet-13700595.pdf?src-supplier=Diodes+Inc+SCT, ComponentLink7URL=https://datasheet.octopart.com:443/MMBT2222A-7-F-Diodes-Inc.-datasheet-13700595.pdf?src-supplier=Diodes+Inc+SCT, ComponentLink8Description=https://datasheet.octopart.com:443/MMBT2222A-7-F-Diodes-Inc.-datasheet-62305186.pdf?src-supplier=Future+Electronics, ComponentLink8URL=https://datasheet.octopart.com:443/MMBT2222A-7-F-Diodes-Inc.-datasheet-62305186.pdf?src-supplier=Future+Electronics, ComponentLink9Description=https://datasheet.octopart.com:443/MMBT2222A-7-F-Diodes-Inc.-datasheet-14065194.pdf?src-supplier=iiiC, ComponentLink9URL=https://datasheet.octopart.com:443/MMBT2222A-7-F-Diodes-Inc.-datasheet-14065194.pdf?src-supplier=iiiC, ComponentLink10Description=https://datasheet.octopart.com:443/MMBT2222A-7-F-Diodes-Inc.-datasheet-7278093.pdf?src-supplier=Jameco+(USA), ComponentLink10URL=https://datasheet.octopart.com:443/MMBT2222A-7-F-Diodes-Inc.-datasheet-7278093.pdf?src-supplier=Jameco+(USA), ComponentLink11Description=https://datasheet.octopart.com:443/MMBT2222A-7-F-Diodes-Inc.-datasheet-55952.pdf?src-supplier=Garrett, ComponentLink11URL=https://datasheet.octopart.com:443/MMBT2222A-7-F-Diodes-Inc.-datasheet-55952.pdf?src-supplier=Garrett, ComponentLink12Description=https://datasheet.octopart.com:443/MMBT2222A-7-F-Diodes-Inc.-datasheet-135438.pdf?src-supplier=DigiKey, ComponentLink12URL=https://datasheet.octopart.com:443/MMBT2222A-7-F-Diodes-Inc.-datasheet-135438.pdf?src-supplier=DigiKey, ComponentLink13Description=http://sigma.octopart.com:80/15540767/rohs_certificate/Diodes-Inc.-MMBT2222A-7-F.pdf?src-supplier=Compliance+Statements, ComponentLink13URL=http://sigma.octopart.com:80/15540767/rohs_certificate/Diodes-Inc.-MMBT2222A-7-F.pdf?src-supplier=Compliance+Statements, Contact Plating=Tin, Country of Origin="Mainland China, Taiwan", Current Rating=600mA, Element Configuration=Single, Export Control Classification Number (ECCN) Code=EAR99, Frequency=300MHz, Gain Bandwidth Product=300MHz, Height=1.1mm, hFE Min=40, Introduction Date=2003-04-14, Lead Free="Lead Free", Length=3mm, Lifecycle Status=Production, Manufacturer Part Number=MMBT2222A-7-F, Max Breakdown Voltage=40V, Max Collector Current=600mA, Max Operating Temperature=150°C, Mounting Technology="Surface Mount", Number of Elements=1, Number of Terminals=3, Packaging="Tape and Reel", Pins=3, Polarity=NPN, Pricing="3000=0.03404, 9000=0.02827 (USD)", Radiation Hardening=No, REACH SVHC=Yes, RoHS=Compliant, Schedule B="8541210080, 8541210080|8541210080|8541210080|8541210080|8541210080|8541210080|8541210080|8541210080|8541210080|8541210080|8541210080|8541210080|8541210080|8541210080|8541210080|8541210080|8541210080|8541210080|8541210080|8541210080|8541210080|8541210080|8541210080|85", Stock=578136, Supplier=DigiKey, Termination=SMD/SMT, Transition Frequency=300MHz, Voltage=40V, Voltage Rating (DC)=40V, Weight=7.994566mg, Width=1.4mm
T3: "Power MOSFET, N Channel, 60 V, 360 mA, 1.6 Ohm, SOT-23 (TO-236AB), 3 Pins, Surface Mount", Ambient Temperature Range High=150°C, Case/Package=SOT, Continuous Drain Current (ID)=360mA, Drain to Source Breakdown Voltage=60V, Drain to Source Resistance=1.6Ω, Gate to Source Voltage (Vgs)=20V, Input Capacitance=50pF, Manufacturer=Nexperia, Manufacturer Lifecycle Status="RELEASED FOR SUPPLY", Max Power Dissipation=1.14W, Min Operating Temperature=-55°C, Power Dissipation=350mW, Ratings=AEC-Q101, Supplier Part Number=1727-1142-6-ND, Category=MOSFETs, China RoHS=Compliant, ComponentLink1Description=https://sigma.octopart.com:443/138797052/technical_drawing/Nexperia-BSS138P%2C215.pdf?src-supplier=Upverter, ComponentLink1URL=https://sigma.octopart.com:443/138797052/technical_drawing/Nexperia-BSS138P%2C215.pdf?src-supplier=Upverter, ComponentLink2Description=https://datasheet.octopart.com:443/BSS138P%2C215-Nexperia-datasheet-10026448.pdf?src-supplier=Newark, ComponentLink2URL=https://datasheet.octopart.com:443/BSS138P%2C215-Nexperia-datasheet-10026448.pdf?src-supplier=Newark, ComponentLink3Description=https://datasheet.octopart.com:443/BSS138P%2C215-Nexperia-datasheet-87581095.pdf?src-supplier=Newark, ComponentLink3URL=https://datasheet.octopart.com:443/BSS138P%2C215-Nexperia-datasheet-87581095.pdf?src-supplier=Newark, ComponentLink4Description=https://datasheet.octopart.com:443/BSS138P%2C215-Nexperia-datasheet-180923549.pdf?src-supplier=Farnell, ComponentLink4URL=https://datasheet.octopart.com:443/BSS138P%2C215-Nexperia-datasheet-180923549.pdf?src-supplier=Farnell, ComponentLink5Description=http://sigma.octopart.com:80/reach_statement/NXP-Semiconductors-company-13.pdf?src-supplier=Compliance+Statements, ComponentLink5URL=http://sigma.octopart.com:80/reach_statement/NXP-Semiconductors-company-13.pdf?src-supplier=Compliance+Statements, ComponentLink6Description=http://sigma.octopart.com:80/rohs_statement/NXP-Semiconductors-company-12.pdf?src-supplier=Compliance+Statements, ComponentLink6URL=http://sigma.octopart.com:80/rohs_statement/NXP-Semiconductors-company-12.pdf?src-supplier=Compliance+Statements, Contact Plating=Tin, Drain to Source Voltage (Vdss)=60V, Fall Time=4ns, Height=1.1mm, Lead Free="Lead Free", Lifecycle Status=Production, Manufacturer Part Number=BSS138P,215, Max Dual Supply Voltage=60V, Max Junction Temperature (Tj)=150°C, Max Operating Temperature=150°C, Min Breakdown Voltage=60V, Number of Channels=1, Number of Elements=1, Number of Terminals=3, Packaging="Tape & Reel", Pins=3, Pricing="1=0.19, 10=0.119, 50=0.0848, 100=0.0735, 500=0.05348 (USD)", Radiation Hardening=No, Rds On Max=1.6Ω, REACH SVHC=Yes, Rise Time=3ns, RoHS=Compliant, Schedule B="8541210080, 8541210080|8541210080|8541210080|8541210080|8541210080", Stock=186831, Supplier=DigiKey, Turn-Off Delay Time=9ns, Turn-On Delay Time=2ns
U1A: "RISC Microcontroller, 32-Bit, FLASH, CORTEX-M7 CPU, 480MHz, CMOS, PBGA265", Ambient Temperature Range High=85°C, Case/Package=TFBGA, Clock Frequency=480MHz, Frequency=400MHz, Manufacturer=STMicroelectronics, Manufacturer Package Identifier=TFBGA240+25-A07U, Max Junction Temperature (Tj)=125°C, Max Supply Current=100mA, Max Supply Voltage=3.6V, Min Operating Temperature=-40°C, Min Supply Voltage=1.62V, Nominal Supply Current=4µA, Nominal Supply Voltage (DC)=3.3V, Supplier Part Number=497-17724-ND, Temperature Grade=Industrial, ADC Channels (Resolution)="36-Ch 16-Bit", Category=Microcontrollers, China RoHS=Compliant, ComponentLink1Description=https://datasheet.octopart.com:443/STM32H743XIH6-STMicroelectronics-datasheet-181247497.pdf?src-supplier=IHS, ComponentLink1URL=https://datasheet.octopart.com:443/STM32H743XIH6-STMicroelectronics-datasheet-181247497.pdf?src-supplier=IHS, ComponentLink2Description=https://datasheet.octopart.com:443/STM32H743XIH6-STMicroelectronics-datasheet-67410183.pdf?src-supplier=STMicroelectronics, ComponentLink2URL=https://datasheet.octopart.com:443/STM32H743XIH6-STMicroelectronics-datasheet-67410183.pdf?src-supplier=STMicroelectronics, ComponentLink3Description=https://datasheet.octopart.com:443/STM32H743XIH6-STMicroelectronics-datasheet-98403647.pdf?src-supplier=Farnell, ComponentLink3URL=https://datasheet.octopart.com:443/STM32H743XIH6-STMicroelectronics-datasheet-98403647.pdf?src-supplier=Farnell, ComponentLink4Description=https://datasheet.octopart.com:443/STM32H743XIH6-STMicroelectronics-datasheet-137045257.pdf?src-supplier=TME, ComponentLink4URL=https://datasheet.octopart.com:443/STM32H743XIH6-STMicroelectronics-datasheet-137045257.pdf?src-supplier=TME, ComponentLink5Description=https://datasheet.octopart.com:443/STM32H743XIH6-STMicroelectronics-datasheet-136158773.pdf?src-supplier=Future+Electronics, ComponentLink5URL=https://datasheet.octopart.com:443/STM32H743XIH6-STMicroelectronics-datasheet-136158773.pdf?src-supplier=Future+Electronics, ComponentLink6Description=https://datasheet.octopart.com:443/STM32H743XIH6-STMicroelectronics-datasheet-163660273.pdf?src-supplier=SHENGYU+ELECTRONICS, ComponentLink6URL=https://datasheet.octopart.com:443/STM32H743XIH6-STMicroelectronics-datasheet-163660273.pdf?src-supplier=SHENGYU+ELECTRONICS, Country of Origin="Malaysia, Philippines", DAC Channels (Resolution)="2-Ch 12-Bit", Data Bus Width=32b, Export Control Classification Number (ECCN) Code=3A991.A.2, Flash Memory Size=2MB, Harmonized Tariff Schedule (HTS) Code=8542.31.00.25, Height=1.1mm, Height - Seated (Max)=1.1mm, Interface="CAN, Ethernet, I2C, I2S, IrDA, LIN, SMBus, SPI, UART, USART, USB", Introduction Date=2016-10-19, Length=14mm, Lifecycle Status=Production, Manufacturer Part Number=STM32H743XIH6, Max Operating Temperature=85°C, Memory Format=FLASH, Memory Size=2MB, Number of A/D Converters=3, Number of ADC Channels=36, Number of Channels=36, Number of D/A Converters=2, Number of Ethernet Channels=1, Number of I2C Channels=4, Number of I/Os=11, Number of PWM Channels=48, Number of SPI Channels=6, Number of Terminals=265, Number of Timers/Counters=21, Number of UART Channels=4, Number of USART Channels=4, Number of USB Channels=2, Peripherals="POR, RTC", Pricing="1=22.17, 10=17.671, 50=15.8702, 100=15.3127, 119=15.18899, 595=14.29081 (USD)", RAM Size=1MB, REACH SVHC=Yes, RoHS=Compliant, Schedule B=8542310000, Supplier=DigiKey, Terminal Pitch=800µm, Width=14mm
X1: "Crystal 25.0000MHZ 8PF SMD", Manufacturer=NDK, Supplier Part Number=644-CG06750-25MDKR-ND, Category=Crystals, Manufacturer Part Number=CG06750-25M, Pricing="1=0.96, 10=0.831, 25=0.7864, 50=0.7538, 100=0.7225, 250=0.68328, 500=0.65502, 1000=0.62793 (USD)", Stock=4012, Supplier=DigiKey
X2 X3 X4: library part MU00525-32.768K, "Parallel - Fundamental Quartz Crystal, 0.032768MHz Nom", ESR (Equivalent Series Resistance)=70kΩ, Frequency=32.768kHz, Frequency Stability=144ppm, Frequency Tolerance=0.002%, Load Capacitance=6pF, Manufacturer=NDK, Max Operating Temperature=85°C, Min Operating Temperature=-40°C, Supplier Part Number=644-MU00525-32.768KDKR-ND, Category=Crystals, ComponentLink1Description=https://datasheet.octopart.com:443/MU00525-32.768K-NDK-datasheet-155922648.pdf?src-supplier=Upverter, ComponentLink1URL=https://datasheet.octopart.com:443/MU00525-32.768K-NDK-datasheet-155922648.pdf?src-supplier=Upverter, ESR=50kΩ, Height=900µm, Introduction Date=2024-07-10, Lifecycle Status=Production, Manufacturer Part Number=MU00525-32.768K, Mounting Technology="Surface Mount", Pricing="1=0.63, 10=0.549, 25=0.5188, 50=0.4974, 100=0.4768, 250=0.45088, 500=0.43222, 1000=0.41434 (USD)", REACH SVHC=Yes, RoHS=Compliant, Stock=33390, Supplier=DigiKey, Tolerance=0.002%
X5: "Crystal 32MHz ±10ppm (Tol) ±10ppm (Stability) 10pF FUND 80Ohm 4-Pin SMD T/R", Case/Package=SMD/SMT, ESR (Equivalent Series Resistance)=80Ω, Frequency=32MHz, Frequency Stability=10ppm, Frequency Tolerance=0.001%, Load Capacitance=10pF, Manufacturer="CTS Components", Max Operating Temperature=70°C, Min Operating Temperature=-20°C, Supplier Part Number=110-402F32011CARCT-ND, Category=Crystals, ComponentLink1Description=https://datasheet.octopart.com:443/402F32011CAR-CTS-Components-datasheet-180391954.pdf?src-supplier=IHS, ComponentLink1URL=https://datasheet.octopart.com:443/402F32011CAR-CTS-Components-datasheet-180391954.pdf?src-supplier=IHS, ComponentLink2Description=https://datasheet.octopart.com:443/402F32011CAR-CTS-Components-datasheet-67764839.pdf?src-supplier=Electro+Sonic, ComponentLink2URL=https://datasheet.octopart.com:443/402F32011CAR-CTS-Components-datasheet-67764839.pdf?src-supplier=Electro+Sonic, ComponentLink3Description=https://datasheet.octopart.com:443/402F32011CAR-CTS-Components-datasheet-178464571.pdf?src-supplier=Electro+Sonic, ComponentLink3URL=https://datasheet.octopart.com:443/402F32011CAR-CTS-Components-datasheet-178464571.pdf?src-supplier=Electro+Sonic, ComponentLink4Description=https://datasheet.octopart.com:443/402F32011CAR-CTS-Components-datasheet-147836417.pdf?src-supplier=Future+Electronics, ComponentLink4URL=https://datasheet.octopart.com:443/402F32011CAR-CTS-Components-datasheet-147836417.pdf?src-supplier=Future+Electronics, Contact Plating=Gold, Country of Origin="Mainland China, Taiwan", ESR=80Ω, Harmonized Tariff Schedule (HTS) Code=8541.60.00.60, Height=550µm, Introduction Date=2009-04-24, Length=2.0066mm, Lifecycle Status=Production, Manufacturer Part Number=402F32011CAR, Mounting Technology="Surface Mount", Packaging="Tape & Reel (TR)", Pricing="1=0.44, 10=0.378, 25=0.358, 50=0.343, 100=0.3288, 250=0.31096, 500=0.2981, 1000=0.28577 (USD)", REACH SVHC=Yes, RoHS=Compliant, Stock=5517, Supplier=DigiKey, Termination=SMD/SMT, Tolerance=0.001%, Width=1.6002mm

## Via types
v1: diameter 12, hole 6, L1_TOP to L8_BOTTOM, tented both sides, 1724 vias